# Altium PCB PitchShifter-PCB.PcbDoc (part 1 of 2)
Units mm, origin at the board's own origin, x right, y up, seen from the top; angles counter-clockwise.
Board outline 358.8 x 340 mm, 2 copper layers (Top Layer, Bottom Layer); 248 components, 206 nets, 919 pads, 27 vias.
Unrouted connection lines stored in the file: 494.
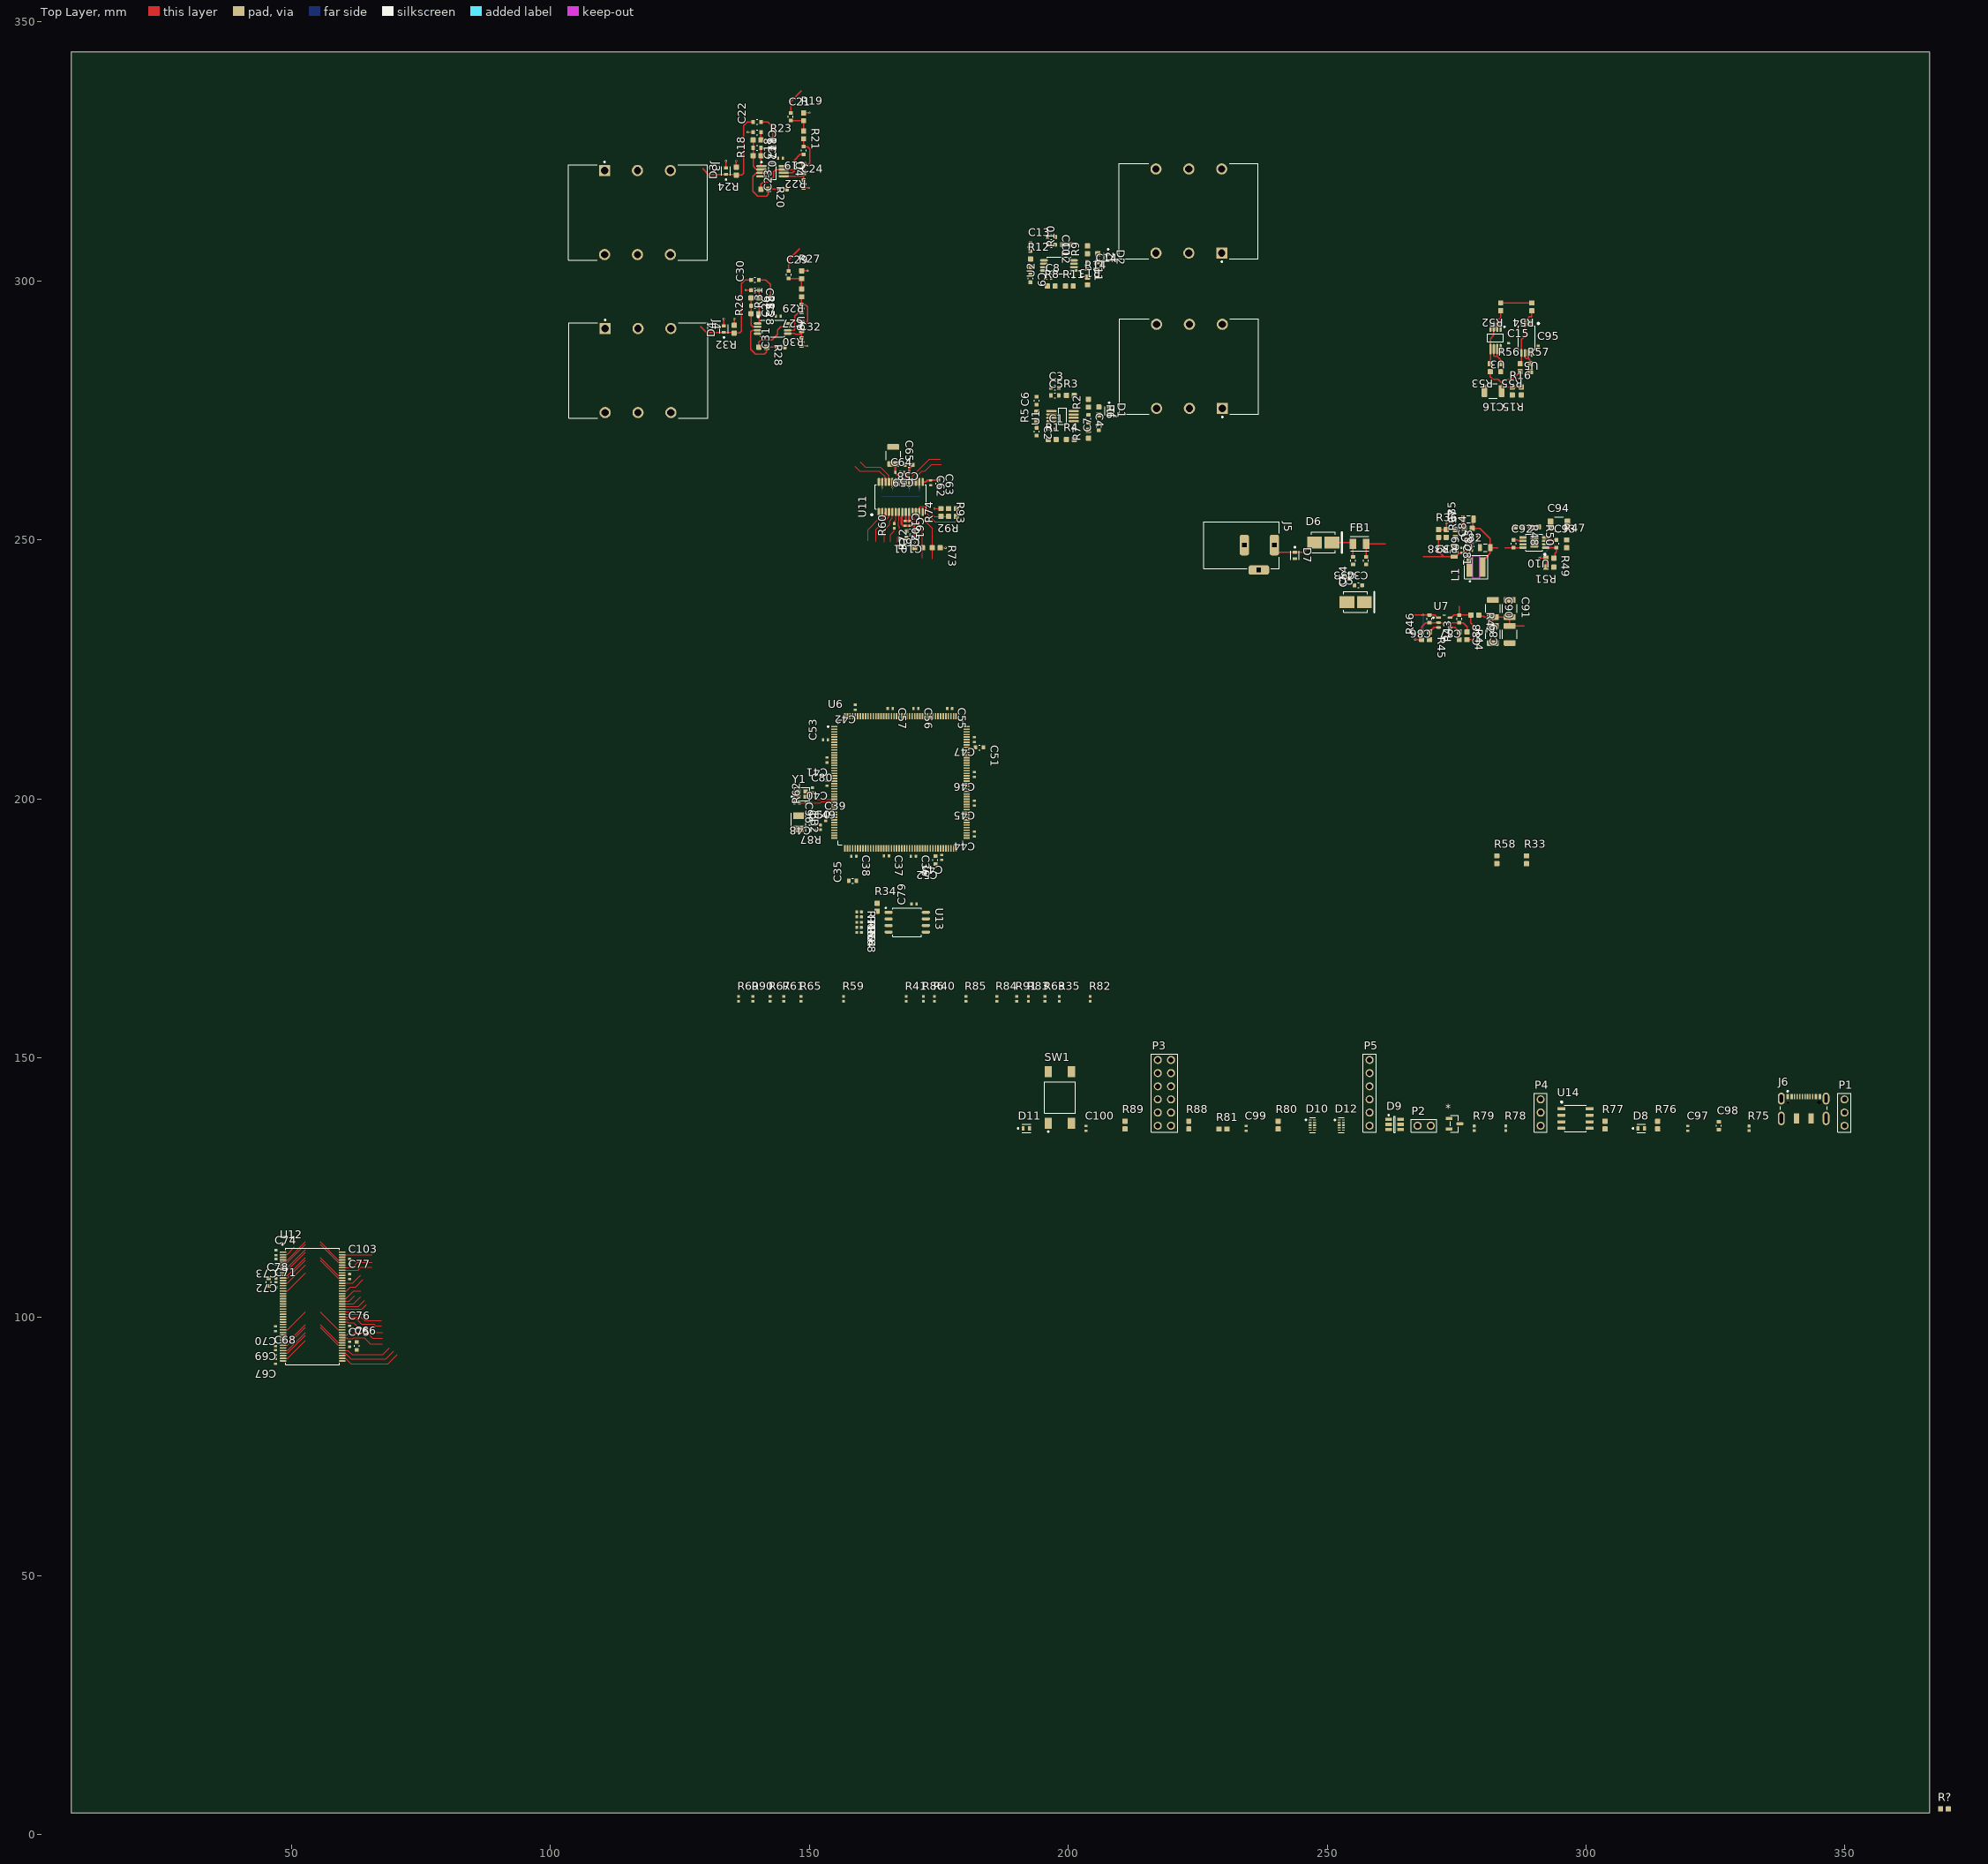
[diagram p0: Top Layer view]
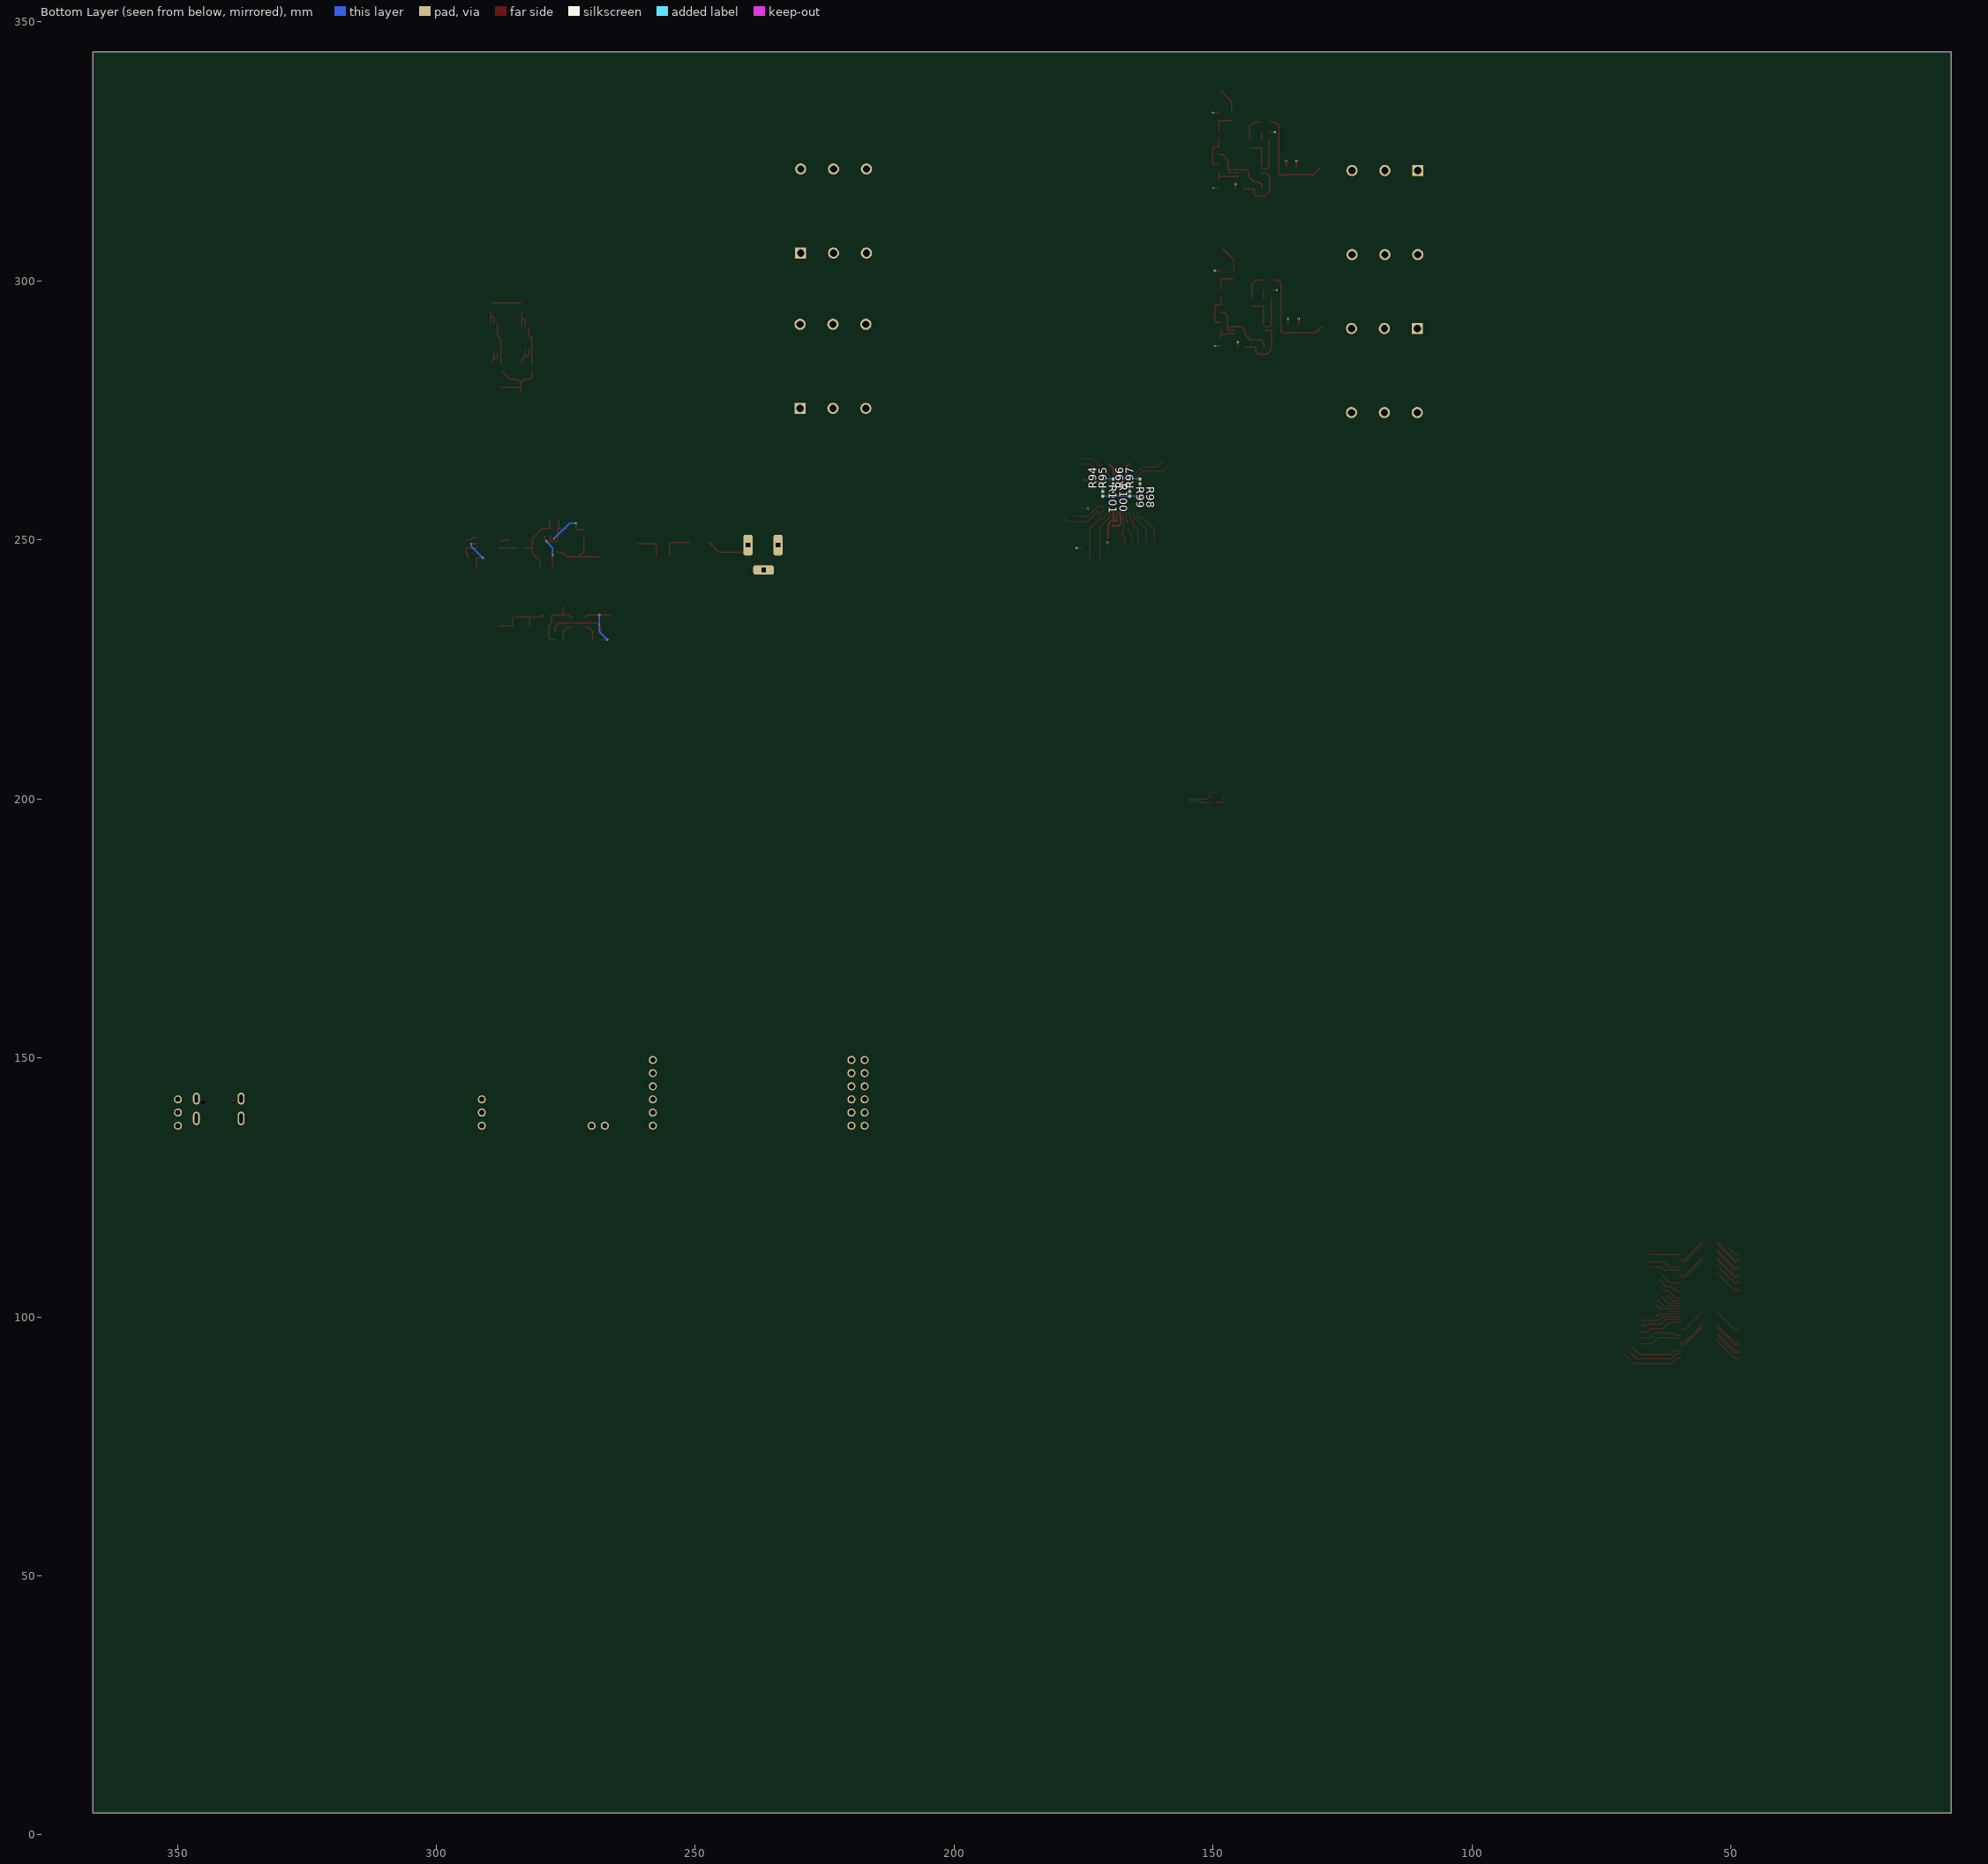
[diagram p1: Bottom Layer view, seen from below]

## Layer stack, top to bottom
Top Solder: solder mask 0.0102, Solder Resist, Dk 3.5
Top Layer: signal copper 0.0356
Dielectric 1: dielectric 0.32, FR-4, Dk 4.8
Bottom Layer: signal copper 0.0356
Bottom Solder: solder mask 0.0102, Solder Resist, Dk 3.5

## Board outline
7.5,4.2 7.5,344.2 366.3,344.2 366.3,4.2

## Design rules (kind name [scope] priority, off if disabled: settings)
Clearance [All] p1: gap=0.254 ignorepadtopadclearanceinfootprint=TRUE except(0.12: Arc-Arc Arc-Track Arc-SMDPad Track-Track Track-SMDPad SMDPad-SMDPad)
PolygonConnect [All] p1: connectstyle=Relief reliefconductorwidth=0.254 reliefentries=4 polygonreliefangle="90 Angle" airgapwidth=0.254
RoutingVias [All] p1: holewidth=0.711 width=1.27 viastyle="Through Hole" minholewidth=0.711 minwidth=1.27 maxholewidth=0.711 maxwidth=1.27
SolderMaskExpansion [All] p1: expansion=0 istentingtop=FALSE
SupplyNets "Schematic Supply Nets_13" [InNet('+VCC_FILT')] p1: voltage=0.000
SupplyNets "Schematic Supply Nets_10" [InNet('VCOM')] p2: voltage=0.000
SupplyNets "Schematic Supply Nets" [InNet('+3V3')] p3: voltage=0.000
SupplyNets "Schematic Supply Nets_4" [InNet('+V_USB')] p4: voltage=0.000
SupplyNets "Schematic Supply Nets_1" [InNet('+5V')] p5: voltage=0.000
SupplyNets "Schematic Supply Nets_12" [InNet('+4V')] p6: voltage=0.000
SupplyNets "Schematic Supply Nets_11" [InNet('+3V3A')] p7: voltage=0.000
SupplyNets "Schematic Supply Nets_9" [InNet('+VBUS')] p8: voltage=0.000
SupplyNets "Schematic Supply Nets_8" [InNet('+VBR')] p9: voltage=0.000
SupplyNets "Schematic Supply Nets_7" [InNet('+VCC_RP')] p10: voltage=0.000
SupplyNets "Schematic Supply Nets_6" [InNet('+VBL')] p11: voltage=0.000
SupplyNets "Schematic Supply Nets_5" [InNet('GND')] p12: voltage=0.000
SupplyNets "Schematic Supply Nets_3" [InNet('+VCC')] p13: voltage=0.000
SupplyNets "Schematic Supply Nets_2" [InNet('+5VA')] p14: voltage=0.000
Width [All] p1: maxlimit=1 minlimit=0.11 preferedwidth=0.2
30 further rules are at their usual default settings.

## Classes and differential pairs
net class SDRAM_MASK: RAM_DM0 RAM_DM1 RAM_DM2 RAM_DM3
net class SDRAM_DATA: RAM_D0 RAM_D1 RAM_D2 RAM_D3 RAM_D4 RAM_D5 RAM_D6 RAM_D7 RAM_D8 RAM_D9 RAM_D10 RAM_D11 RAM_D12 RAM_D13 RAM_D14 RAM_D15 RAM_D16 RAM_D17 RAM_D18 RAM_D19 RAM_D20 RAM_D21 RAM_D22 RAM_D23 RAM_D24 RAM_D25 RAM_D26 RAM_D27 RAM_D28 RAM_D29 RAM_D30 RAM_D31
net class SDRAM_CTRL: RAM_BA0 RAM_BA1 RAM_CKE RAM_CLK RAM_NCAS RAM_NCS RAM_NRAS RAM_NWE
net class SDRAM_ADR: RAM_A0 RAM_A1 RAM_A2 RAM_A3 RAM_A4 RAM_A5 RAM_A6 RAM_A7 RAM_A8 RAM_A9 RAM_A10 RAM_A11
net class QSPI: QSPI_CLK QSPI_CS QSPI_IO0 QSPI_IO1 QSPI_IO2 QSPI_IO3
component class Peripherals: * C97 C98 C99 C100 D8 D9 D10 D11 D12 J6 P1 P2 P3 P4 P5 R75 R76 R77 R78 R79 R80 R81 R88 R89 SW1 U14
component class Power: C33 C34 C54 C81 C82 C83 C84 C85 C86 C87 C88 C89 C90 C91 C92 C93 C94 D5 D6 D7 FB1 J5 L1 R36 R37 R38 R39 R42 R43 R44 R45 R46 R47 R48 R49 R50 R51 R? U7 U9 U10
component class Memory: C66 C67 C68 C69 C70 C71 C72 C73 C74 C75 C76 C77 C78 C79 C103 R34 U12 U13
component class MCU: C35 C36 C37 C38 C39 C40 C41 C42 C43 C44 C45 C46 C47 C48 C49 C50 C51 C52 C53 C55 C56 C57 C80 C96 FB2 R35 R40 R41 R59 R61 R62 R63 R64 R65 R66 R67 R68 R69 R70 R71 R82 R83 R84 R85 R86 R87 R90 R91 U6 Y1
component class Codec: C58 C59 C60 C61 C62 C63 C64 C65 C101 C102 R60 R72 R73 R74 R92 R93 R94 R95 R96 R97 R98 R99 R100 R101 U11
component class Analogue_OUT: C17 C18 C19 C20 C21 C22 C23 C24 C25 C26 C27 C28 C29 C30 C31 C32 D3 D4 J3 J4 R17 R18 R19 R20 R21 R22 R23 R24 R25 R26 R27 R28 R29 R30 R31 R32 U4 U8
component class Analogue_IN: C1 C2 C3 C4 C5 C6 C7 C8 C9 C10 C11 C12 C13 C14 C15 C16 C95 D1 D2 J1 J2 R1 R2 R3 R4 R5 R6 R7 R8 R9 R10 R11 R12 R13 R14 R15 R16 R33 R52 R53 R54 R55 R56 R57 R58 U1 U2 U3 U5

## Components (designator, comment, footprint, x,y, rotation, side; value= is the part's Value field where it differs from the comment)
* "ESD2CAN24DBZRQ1" SOT-23_ESD2CAN24DBZRQ1 274.574,137.287 r0 top
C1 "100n" CAPC1005X50N_0402 196.9,271.4 r0 top
C2 "1n5" C_0402 193.9,270.9 r270 top
C3 "2u2" C_0402 197.4,279.4 r0 top
C4 "10n" C_0402 203.9,273.4 r270 top
C5 "220p" C_0402 197.4,277.9 r0 top
C6 "1n5" C_0402 193.9,276.9 r90 top
C7 "220p" C_0402 205.9,271.9 r90 top
C8 "100n" CAPC1005X50N_0402 196.2,300.5 r0 top
C9 "1n5" C_0402 192.7,300.5 r270 top
C10 "2u2" C_0402 196.7,308.5 r0 top
C11 "10n" C_0402 203.7,303 r270 top
C12 "220p" C_0402 196.7,307 r0 top
C13 "1n5" C_0402 192.7,306.5 r90 top
C14 "220p" C_0402 205.7,301.5 r90 top
C15 "100n" CAPC1005X50N_0402 285,287.5 r90 top
C16 "100u" C_1210 282,278.75 r180 top
C17 "2u2" C_0402 139.9,328.7 r0 top
C18 "100n" CAPC1005X50N_0402 144.4,323.7 r180 top
C19 "1n5" C_0402 148.9,325.2 r270 top
C20 "220p" C_0402 139.9,325.7 r0 top
C21 "2u2" C_0402 146.4,331.7 r90 top
C22 "2u2" C_0402 139.9,330.7 r180 top
C23 "220p" C_0402 144.9,317.7 r180 top
C24 "1n5" C_0402 148.9,318.7 r90 top
C25 "2u2" C_0402 139.5,298.2 r0 top
C26 "100n" CAPC1005X50N_0402 144,293.2 r180 top
C27 "1n5" C_0402 148.5,294.7 r270 top
C28 "220p" C_0402 139.5,295.2 r0 top
C29 "2u2" C_0402 146,301.2 r90 top
C30 "2u2" C_0402 139.5,300.2 r180 top
C31 "220p" C_0402 144.5,287.2 r180 top
C32 "1n5" C_0402 148.5,288.2 r90 top
C33 "2u2" C_0402 255,246 r270 top
C34 "2u2" C_0402 257.5,246 r270 top
C35 "2u2" C_0402 158.35,184.2 r180 top
C36 "100n" CAPC1005X50N_0402 170.1,188.95 r0 top
C37 "100n" CAPC1005X50N_0402 164.9,189 r0 top
C38 "100n" CAPC1005X50N_0402 158.6,188.95 r0 top
C39 "100n" CAPC1005X50N_0402 153.15,196.25 r90 top
C40 "100n" CAPC1005X50N_0402 153.4,203 r270 top
C41 "100n" CAPC1005X50N_0402 153.4,207.5 r270 top
C42 "100n" CAPC1005X50N_0402 158.85,217.7 r270 top
C43 "100n" CAPC1005X50N_0402 175.6,188.7 r270 top
C44 "100n" CAPC1005X50N_0402 181.85,193.2 r270 top
C45 "100n" CAPC1005X50N_0402 181.85,199.2 r270 top
C46 "100n" CAPC1005X50N_0402 181.85,204.7 r270 top
C47 "100n" CAPC1005X50N_0402 181.85,211.45 r270 top
C48 "100n" CAPC1005X50N_0402 150.15,196.25 r270 top
C49 "100n" CAPC1005X50N_0402 151.15,194.5 r90 top
C50 "100n" CAPC1005X50N_0402 150.15,194.5 r90 top
C51 "2u2" C_0402 182.85,209.95 r0 top
C52 "2u2" C_0402 174.35,188.2 r270 top
C53 "100n" CAPC1005X50N_0402 153.1,211.45 r180 top
C54 "2u2" C_0402 256,241.25 r180 top
C55 "100n" CAPC1005X50N_0402 177.1,217.45 r0 top
C56 "100n" CAPC1005X50N_0402 170.6,217.45 r0 top
C57 "100n" CAPC1005X50N_0402 165.6,217.45 r0 top
C58 "1u" C_0402 169.2,264.5 r180 top
C59 "100n" CAPC1005X50N_0402 168.8,263 r180 top
C60 "1u" C_0402 169.5,251.7 r180 top
C61 "100n" CAPC1005X50N_0402 169.4,253.2 r270 top
C62 "100n" CAPC1005X50N_0402 173.4,261.05 r270 top
C63 "1u" C_0402 174.9,260.9 r270 top
C64 "100n" CAPC1005X50N_0402 167.1,263 r0 top
C65 "47u" C_1210 166.2,266.3 r270 top
C66 "2u2" C_0402 62.6,94.4 r90 top
C67 "100n" CAPC1005X50N_0402 46.9,91.4 r270 top
C68 "100n" CAPC1005X50N_0402 46.9,93.1 r90 top
C69 "100n" CAPC1005X50N_0402 46.9,94.8 r270 top
C70 "100n" CAPC1005X50N_0402 46.9,97.7 r270 top
C71 "100n" CAPC1005X50N_0402 47,106.2 r90 top
C72 "100n" CAPC1005X50N_0402 47,107.9 r270 top
C73 "100n" CAPC1005X50N_0402 47,110.7 r270 top
C74 "100n" CAPC1005X50N_0402 47,112.4 r90 top
C75 "100n" CAPC1005X50N_0402 61.2,94.7 r90 top
C76 "100n" CAPC1005X50N_0402 61.2,97.8 r90 top
C77 "100n" CAPC1005X50N_0402 61.2,107.8 r90 top
C78 "2u2" C_0402 45.6,106.7 r90 top
C79 "100n" CAPC1005X50N_0402 170.2,179.7 r180 top
C80 "5p6" CAPC1005X50N_0402 150.6,201.7 r90 top
C81 "10u" C_0805 274.5,247.75 r270 top
C82 "100n" CAPC1005X50N_0402 276,248 r90 top
C83 "22u" C_0805 280.5,248.5 r180 top
C84 "100n" CAPC1005X50N_0402 278.5,250.75 r180 top
C85 "47p" C_0805 277.25,254 r180 top
C86 "2u2" C_0402 269.75,234.75 r270 top
C87 "2u2" C_0402 275.5,234.75 r270 top
C88 "47u" C_1210 282,231.75 r90 top
C89 "47u" C_1210 285.25,231.75 r90 top
C90 "47u" C_1210 282,236.75 r270 top
C91 "47u" C_1210 285.25,236.75 r270 top
C92 "2u2" C_0402 286,249.25 r90 top
C93 "2u2" C_0402 294.25,249.25 r90 top
C94 "47u" C_1210 294.75,253 r0 top
C95 "100n" CAPC1005X50N_0402 290.75,287 r90 top
C96 "5p6" CAPC1005X50N_0402 147.6,199.2 r0 top
C97 "100n" CAPC1005X50N_0402 319.659,136.398 r90 top
C98 "2u2" C_0402 325.628,136.906 r90 top
C99 "100n" CAPC1005X50N_0402 234.315,136.398 r90 top
C100 "100n" CAPC1005X50N_0402 203.454,136.398 r90 top
C101 "1u" C_0402 169.5,250.4 r180 top
C102 "100n" CAPC1005X50N_0402 168.5,253.2 r270 top
C103 "100n" CAPC1005X50N_0402 61.2,110.7 r90 top
D1 "0603ESDA-05N" FP-1610-MFG 207.9,274.9 r270 top
D2 "0603ESDA-05N" FP-1610-MFG 207.7,304.5 r270 top
D3 "0603ESDA-05N" FP-1610-MFG 133.9,321.2 r90 top
D4 "0603ESDA-05N" FP-1610-MFG 133.5,290.7 r90 top
D5 "BAT165AX" JCET-SMB-2_M 255.5,238 r0 top
D6 "BAT165AX" JCET-SMB-2_M 249.25,249.5 r0 top
D7 "CG0402MLU-12G" FP-1610-MFG 243.75,247 r270 top
D8 "CG0402MLU-12G" FP-1610-MFG 310.642,136.398 r0 top
D9 "USBLC6-2SC6" STM-SOT23-6L_V 263.017,137.16 r0 top
D10 "TPD4E02B04DQAR" FP-DQA0010A-MFG 247.142,137.033 r0 top
D11 "CG0402MLU-3.3LG" FP-1610-MFG 191.897,136.398 r0 top
D12 "TPD4E02B04DQAR" FP-DQA0010A-MFG 252.73,137.033 r0 top
FB1 "120R" FP-NFZ32BW-w2_8-MFG 256.25,249.25 r0 top
FB2 "120R" FP-NFZ32BW-w2_8-MFG 147.9,195.5 r270 top
J1 "NMJ6HCD2" FP-NMJ6HCD2-MFG 223.315,283.515 r180 top
J2 "NMJ6HCD2" FP-NMJ6HCD2-MFG 223.2,313.5 r180 top
J3 "NMJ6HCD2" FP-NMJ6HCD2-MFG 116.9,313.2 r0 top
J4 "NMJ6HCD2" FP-NMJ6HCD2-MFG 117,282.7 r0 top
J5 "694108301002" 694108301002 233.45,249 r270 top
J6 "DX07S016JA1R1500" FP-DX07S016JA1R1500-MFG 342.011,139.319 r0 top
L1 "3u3" WE-XHMI_4030 278.75,244.75 r90 top
P1 "Male Pin Header 1x3 2.54mm" "Copy of Copy of Copy of Copy of Copy of 3M-2340-6111TG_V" 351.79,134.874 r90 top
P2 "JP" "Copy of Copy of Copy of Copy of 3M-2340-6111TG_V"#1 265.43,135.001 r0 top
P3 "Male Pin Header 2x6 2.54mm" "Copy of Copy of Copy of 3M-2340-6111TG_V" 221.742,134.874 r90 top
P4 "Male Pin Header 1x3 2.54mm" "Copy of Copy of Copy of Copy of Copy of 3M-2340-6111TG_V" 293.116,134.874 r90 top
P5 "Male Pin Header 1x6 2.54mm" "Copy of Copy of Copy of Copy of 3M-2340-6111TG_V"#2 260.096,134.874 r90 top
R1 "5k1" R_0603 196.9,269.4 r0 top
R2 "1M" R_0603 203.9,276.4 r90 top
R3 "5k1" R_0603 200.4,277.9 r0 top
R4 "5k1" R_0603 200.4,269.4 r0 top
R5 "5k1" R_0603 193.9,273.9 r90 top
R6 "68R" R_0603 205.9,274.9 r270 top
R7 "1M" R_0603 203.9,270.4 r90 top
R8 "5k1" R_0603 196.7,299 r0 top
R9 "1M" R_0603 203.7,306 r90 top
R10 "5k1" R_0603 199.7,307 r180 top
R11 "5k1" R_0603 200.2,299 r0 top
R12 "5k1" R_0603 192.7,303.5 r90 top
R13 "68R" R_0603 205.7,304.5 r270 top
R14 "1M" R_0603 203.7,300 r90 top
R15 "5k1" R_0603 287.5,278.75 r270 top
R16 "5k1" R_0603 285.75,278.75 r90 top
R17 "5k1" R_0603 139.9,327.2 r0 top
R18 "5k1" R_0603 139.9,324.2 r180 top
R19 "1M" R_0603 148.9,331.7 r90 top
R20 "5k1" R_0603 141.4,317.7 r0 top
R21 "5k1" R_0603 148.9,328.2 r270 top
R22 "5k1" R_0603 148.9,321.7 r270 top
R23 "68R" R_0603 142.9,326.45 r90 top
R24 "5k1" R_0603 135.9,321.2 r270 top
R25 "5k1" R_0603 139.5,296.7 r0 top
R26 "5k1" R_0603 139.5,293.7 r180 top
R27 "1M" R_0603 148.5,301.2 r90 top
R28 "5k1" R_0603 141,287.2 r0 top
R29 "5k1" R_0603 148.5,297.7 r270 top
R30 "5k1" R_0603 148.5,291.2 r270 top
R31 "68R" R_0603 142.5,295.95 r90 top
R32 "5k1" R_0603 135.5,290.7 r270 top
R33 "0R" R_0603 288.5,188.25 r90 top
R34 "47k" R_0603 163.1,179.1 r90 top
R35 "33R" R_0402 198.276,161.4 r90 top
R36 "30k" R_0603 271.5,251.25 r90 top
R37 "30k" R_0603 277.25,252.25 r180 top
R38 "30k" R_0603 273,251.25 r270 top
R39 "5k1" R_0603 274.75,251.25 r270 top
R40 "33R" R_0402 174.146,161.4 r90 top
R41 "33R" R_0402 168.685,161.4 r90 top
R42 "10R" R_0603 278.5,235.5 r0 top
R43 "47k" R_0603 276.25,230.75 r180 top
R44 "15k" R_0603 276.25,232.25 r0 top
R45 "30k" R_0603 269,230.75 r0 top
R46 "30k" R_0603 269,232.25 r180 top
R47 "10R" R_0603 296.25,249.25 r90 top
R48 "30k" R_0603 287,252.5 r0 top
R49 "0R" R_0603 293,246.5 r0 top
R50 "30k" R_0603 290,252.5 r0 top
R51 "DNP" R_0603 293,244.75 r180 top
R52 "0R" R_0603 283.5,295 r270 top
R53 "0R" R_0603 281.5,283.25 r270 top
R54 "0R" R_0603 289.5,295 r270 top
R55 "0R" R_0603 287.25,283.25 r270 top
R56 "0R" R_0603 283.5,283.25 r90 top
R57 "0R" R_0603 289.25,283.25 r90 top
R58 "0R" R_0603 282.75,188.25 r90 top
R59 "33R" R_0402 156.62,161.4 r90 top
R60 "33R" R_0402 166.4,252.7 r90 top
R61 "33R" R_0402 145.063,161.4 r90 top
R62 "49R9" R_0402 149.85,199.2 r180 top
R63 "33R" R_0402 195.498,161.4 r90 top
R64 "33R" R_0402 159.6,175.2 r0 top
R65 "33R" R_0402 148.381,161.4 r90 top
R66 "33R" R_0402 159.6,177.228 r0 top
R67 "33R" R_0402 142.412,161.4 r90 top
R68 "33R" R_0402 159.6,174.2 r0 top
R69 "33R" R_0402 136.316,161.4 r90 top
R70 "33R" R_0402 159.6,176.2 r0 top
R71 "33R" R_0402 159.6,178.2 r0 top
R72 "2k2" R_0603 171.1,248.5 r180 top
R73 "2k2" R_0603 174.5,248.5 r0 top
R74 "DNP" R_0603 175.4,255.3 r90 top
R75 "33R" R_0402 331.47,136.398 r90 top
R76 "5k1" R_0603 313.817,137.033 r90 top
R77 "5k1" R_0603 303.657,137.033 r90 top
R78 "33R" R_0402 284.48,136.398 r90 top
R79 "120R" R_0402 278.384,136.398 r90 top
R80 "30k" R_0603 240.538,137.033 r90 top
R81 "30k" R_0603 229.87,136.271 r0 top
R82 "33R" R_0402 204.245,161.4 r90 top
R83 "33R" R_0402 192.307,161.4 r90 top
R84 "33R" R_0402 186.211,161.4 r90 top
R85 "33R" R_0402 180.242,161.4 r90 top
R86 "33R" R_0402 172.003,161.4 r90 top
R87 "0R" R_0402 152.15,194.5 r270 top
R88 "30k" R_0603 223.266,137.033 r90 top
R89 "10k" R_0603 210.947,137.033 r90 top
R90 "33R" R_0402 139.094,161.4 r90 top
R91 "33R" R_0402 190.037,161.4 r90 top
R92 "10k" R_0603 178.4,255.3 r270 top
R93 "10k" R_0603 176.9,255.3 r270 top
R94 "DNP" R_0402 171.3,261.3 r90 bottom
R95 "DNP" R_0402 169.3,261.3 r90 bottom
R96 "DNP" R_0402 166.1,261.3 r90 bottom
R97 "DNP" R_0402 164.1,261.3 r90 bottom
R98 "DNP" R_0402 164.1,258.9 r270 bottom
R99 "DNP" R_0402 166.1,258.9 r270 bottom
R100 "DNP" R_0402 169.3,258.9 r270 bottom
R101 "DNP" R_0402 171.3,258.9 r270 bottom
R? "0R" R_0603 369.199,5 r0 top
SW1 "1301.9316.24" FP-1301_9316_24-MFG 198.374,142.367 r90 top
U1 "MCP6002-E/MS" MSOP-MS8_M 198.9,273.9 r180 top
U2 "TLV9062IPWR" TSSOP-8_TLV9062IPWR 198.2,303 r180 top
U3 "MCP6002-E/MS" MSOP-MS8_M 282.5,289 r270 top
U4 "MCP6002-E/MS" MSOP-MS8_M 142.9,321.2 r0 top
U5 "TLV9062IPWR" TSSOP-8_TLV9062IPWR 288.5,289 r270 top
U6 "STM32H743IIT6" FP-LQFP176-1T-MFG 167.6,203.2 r0 top
U7 "NCP718BSNADJT1G" FP-419AE-01-IPC_C 272.615,234.05 r0 top
U8 "TLV9062IPWR" TSSOP-8_TLV9062IPWR 142.912,290.813 r0 top
U9 "TPS562243DRLR" SOT-563-6_TPS56224 277.5,248.75 r90 top
U10 "TLV76718DGNR" HVSSOP-8-PowerPAD_TLV767 290,249.5 r180 top
U11 "CS4272-DZZ" TSSOP-28_CS4272 167.65,258.3 r90 top
U12 "IS42S32400J-6TL" TSOP-II-86_IS42S32400J-6TL 54.102,102.005 r0 top
U13 "W25Q128JWSIM" SOIC-8_W25Q128JWSIM 168.9,176.2 r0 top
U14 "TCAN3404DRQ1" SOIC-8_TCAN3404DRQ1 297.942,138.303 r0 top
Y1 "25MHz" FP-NX2016SA-MFG 148.6,200.95 r0 top

## Footprints (in the part's own frame and the unit in brackets; to place one, negate y for a bottom-side part, rotate by r counter-clockwise, add the part's x,y. Pads: shape width x height; smd on the part's side, far side on the other; paste and mask are expansions set on the pad)
694108301002 [mm] "DC Power Jack Right Angled(6.4)"
  rrect50% 4x1.8 hole 0.8 square: 1(0,6.35) 2(0,0.55)
  rrect50% 1.8x4 hole 0.8 square: 3(4.8,3.35)
  silkscreen extent -4.5,-7.25 4.5,7.25, body extent -4.5,-7.25 5,7.25, height 10.75
C_0402 [mm] "MLCC 0402"
  rrect25% 0.7x0.8 smd: 1(-0.75,0) 2(0.75,0)
  silkscreen extent -0.14,-0.47 0.14,0.47, body extent -0.8,-0.4 0.8,0.4, height 0.8
C_0805 [mm] "MLCC 0805 Cap"
  rrect25% 0.8x1.4 smd: 1(-1,0) 2(1,0)
  silkscreen extent -0.34,-0.7 0.34,0.7, body extent -1.05,-0.63 1.04,0.63, height 1.25
C_1210 [mm] "MLCC 1210 Cap"
  rrect25% 1.1x2.3 smd: 1(-1.65,0) 2(1.65,0)
  silkscreen extent -0.84,-1.41 0.84,1.41, body extent -1.6,-1.25 1.6,1.25, height 2.5
CAPC1005X50N_0402 [mm] "Chip Capacitor, 2-Leads, Body 0402, 1.00x0.50mm, IPC Medium Density"
  rrect25% 0.45x0.6 smd: 1(-0.475,0) 2(0.475,0)
  body extent -0.5,-0.25 0.5,0.25, height 0.5
"Copy of Copy of Copy of 3M-2340-6111TG_V" [mm] "THD, 40-Leads, Body 101.6x2.54mm, Pitch 2.54mm"
  round 1.55 hole 1.02: 1(2.032,1.905) 2(4.572,1.905) 3(7.112,1.905) 4(9.652,1.905) 5(12.192,1.905) 6(14.732,1.905) 7(2.032,4.445) 7(2.032,4.445) 8(4.572,4.445) 9(7.112,4.445) 10(9.652,4.445) 11(12.192,4.445) 12(14.732,4.445)
  silkscreen extent 0.76,0.64 15.88,5.72, body extent 0.76,0.64 15.88,5.72, height 8.64
"Copy of Copy of Copy of Copy of 3M-2340-6111TG_V"#1 [mm] "THD, 40-Leads, Body 101.6x2.54mm, Pitch 2.54mm"
  round 1.55 hole 1.02: 1(2.032,1.905) 2(4.572,1.905)
  silkscreen extent 0.76,0.64 5.71,3.17, body extent 0.76,0.64 5.71,3.17, height 8.64
"Copy of Copy of Copy of Copy of 3M-2340-6111TG_V"#2 [mm] "THD, 40-Leads, Body 101.6x2.54mm, Pitch 2.54mm"
  round 1.55 hole 1.02: 1(2.032,1.905) 2(4.572,1.905) 3(7.112,1.905) 4(9.652,1.905) 5(12.192,1.905) 6(14.732,1.905)
  silkscreen extent 0.76,0.64 15.88,3.18, body extent 0.76,0.64 15.88,3.18, height 8.64
"Copy of Copy of Copy of Copy of Copy of 3M-2340-6111TG_V" [mm] "THD, 40-Leads, Body 101.6x2.54mm, Pitch 2.54mm"
  round 1.55 hole 1.02: 1(2.032,1.905) 2(4.572,1.905) 3(7.112,1.905)
  silkscreen extent 0.76,0.64 8.25,3.18, body extent 0.76,0.64 8.25,3.18, height 8.64
FP-419AE-01-IPC_C [mm]
  rect 0.94x0.486 smd paste+0 mask+0: 1(-1.115,0.95)
  rrect100% 0.94x0.486 smd paste+0 mask+0: 2(-1.115,0) 3(-1.115,-0.95) 4(1.116,-0.95) 5(1.116,0.95)
  silkscreen extent -2.21,-1.45 0.8,1.45, body extent -1.69,-1.55 1.69,1.55, height 0.25
FP-1301_9316_24-MFG [mm]
  rect 2.1x1.4 smd paste+0 mask+0: 1(-5,2.25) 2(5,2.25) 3(-5,-2.25) 4(5,-2.25)
  silkscreen extent -6.72,-3 3,3, body extent -6.15,-3.1 6.15,3.1, height 0.25
FP-1610-MFG [mm]
  rect 0.55x0.8 smd paste-1000 mask+0: 1(-0.625,0) 2(0.625,0)
  silkscreen extent -1.72,-0.82 0.85,0.82, body extent -1,-0.65 1,0.65, height 0.25
FP-DQA0010A-MFG [mm]
  rrect50% 0.565x0.2 smd paste+0 mask+0: 1(-0.417,1) 2(-0.417,0.5) 4(-0.417,-0.5) 5(-0.417,-1) 6(0.417,-1) 7(0.417,-0.5) 9(0.417,0.5) 10(0.417,1)
  rrect25% 0.565x0.4 smd paste-1000 mask+0: 3(-0.417,0) 8(0.417,0)
  silkscreen extent -1.37,-1.48 0.55,1.48, body extent -0.8,-1.4 0.8,1.4, height 0.25
FP-DX07S016JA1R1500-MFG [mm]
  rrect100% 1.3x2.3 hole 1.6 slot 0.6 at 0 deg paste-2539.97 mask+0: 1(-4.32,2.825) 2(4.32,2.825)
  rrect100% 1.3x2.6 hole 1.9 slot 0.6 at 0 deg paste-2539.97 mask+0: 3(-4.32,-1) 6(4.32,-1)
  rect 1x2 smd paste+0 mask+0: 4(-1.4,-1) 5(1.4,-1)
  rect 0.52x1 smd paste+0 mask+0: A1/B12(-3.1,3.2) A4/B9(-2.35,3.2) A12/B1(3.1,3.2) B4/A9(2.35,3.2)
  rect 0.27x1 smd paste+0 mask+0: A5(-1.75,3.2) A6(-0.25,3.2) A7(0.75,3.2) A8(1.75,3.2) B5(1.25,3.2) B6(0.25,3.2) B7(-0.75,3.2) B8(-1.25,3.2)
  round 0.6 hole 0.6 unplated paste-2539.97 mask+0: ""(-3,2.1)
  rrect100% 0.85x0.6 hole 0.6 slot 0.85 at 0 deg unplated paste-2539.97 mask+0: ""(3,2.1)
  silkscreen extent -4.52,0.67 4.52,4.37, body extent -5.07,-3.75 5.07,4.08, height 0.25
FP-LQFP176-1T-MFG [mm]
  rect 1.2x0.3 smd paste+0 mask+0: 1(-12.75,10.75) 2(-12.75,10.25) 3(-12.75,9.75) 4(-12.75,9.25) 5(-12.75,8.75) 6(-12.75,8.25) 7(-12.75,7.75) 8(-12.75,7.25) 9(-12.75,6.75) 10(-12.75,6.25) 11(-12.75,5.75) 12(-12.75,5.25) 13(-12.75,4.75) 14(-12.75,4.25) 15(-12.75,3.75) 16(-12.75,3.25) 17(-12.75,2.75) 18(-12.75,2.25) 19(-12.75,1.75) 20(-12.75,1.25) 21(-12.75,0.75) 22(-12.75,0.25) 23(-12.75,-0.25) 24(-12.75,-0.75) 25(-12.75,-1.25) 26(-12.75,-1.75) 27(-12.75,-2.25) 28(-12.75,-2.75) 29(-12.75,-3.25) 30(-12.75,-3.75) 31(-12.75,-4.25) 32(-12.75,-4.75) 33(-12.75,-5.25) 34(-12.75,-5.75) 35(-12.75,-6.25) 36(-12.75,-6.75) 37(-12.75,-7.25) 38(-12.75,-7.75) 39(-12.75,-8.25) 40(-12.75,-8.75) 41(-12.75,-9.25) 42(-12.75,-9.75) 43(-12.75,-10.25) 44(-12.75,-10.75) 89(12.75,-10.75) 90(12.75,-10.25) 91(12.75,-9.75) 92(12.75,-9.25) 93(12.75,-8.75) 94(12.75,-8.25) 95(12.75,-7.75) 96(12.75,-7.25) 97(12.75,-6.75) 98(12.75,-6.25) 99(12.75,-5.75) 100(12.75,-5.25) 101(12.75,-4.75) 102(12.75,-4.25) 103(12.75,-3.75) 104(12.75,-3.25) 105(12.75,-2.75) 106(12.75,-2.25) 107(12.75,-1.75) 108(12.75,-1.25) 109(12.75,-0.75) 110(12.75,-0.25) 111(12.75,0.25) 112(12.75,0.75) 113(12.75,1.25) 114(12.75,1.75) 115(12.75,2.25) 116(12.75,2.75) 117(12.75,3.25) 118(12.75,3.75) 119(12.75,4.25) 120(12.75,4.75) 121(12.75,5.25) 122(12.75,5.75) 123(12.75,6.25) 124(12.75,6.75) 125(12.75,7.25) 126(12.75,7.75) 127(12.75,8.25) 128(12.75,8.75) 129(12.75,9.25) 130(12.75,9.75) 131(12.75,10.25) 132(12.75,10.75)
  rect 0.3x1.2 smd paste+0 mask+0: 45(-10.75,-12.75) 46(-10.25,-12.75) 47(-9.75,-12.75) 48(-9.25,-12.75) 49(-8.75,-12.75) 50(-8.25,-12.75) 51(-7.75,-12.75) 52(-7.25,-12.75) 53(-6.75,-12.75) 54(-6.25,-12.75) 55(-5.75,-12.75) 56(-5.25,-12.75) 57(-4.75,-12.75) 58(-4.25,-12.75) 59(-3.75,-12.75) 60(-3.25,-12.75) 61(-2.75,-12.75) 62(-2.25,-12.75) 63(-1.75,-12.75) 64(-1.25,-12.75) 65(-0.75,-12.75) 66(-0.25,-12.75) 67(0.25,-12.75) 68(0.75,-12.75) 69(1.25,-12.75) 70(1.75,-12.75) 71(2.25,-12.75) 72(2.75,-12.75) 73(3.25,-12.75) 74(3.75,-12.75) 75(4.25,-12.75) 76(4.75,-12.75) 77(5.25,-12.75) 78(5.75,-12.75) 79(6.25,-12.75) 80(6.75,-12.75) 81(7.25,-12.75) 82(7.75,-12.75) 83(8.25,-12.75) 84(8.75,-12.75) 85(9.25,-12.75) 86(9.75,-12.75) 87(10.25,-12.75) 88(10.75,-12.75) 133(10.75,12.75) 134(10.25,12.75) 135(9.75,12.75) 136(9.25,12.75) 137(8.75,12.75) 138(8.25,12.75) 139(7.75,12.75) 140(7.25,12.75) 141(6.75,12.75) 142(6.25,12.75) 143(5.75,12.75) 144(5.25,12.75) 145(4.75,12.75) 146(4.25,12.75) 147(3.75,12.75) 148(3.25,12.75) 149(2.75,12.75) 150(2.25,12.75) 151(1.75,12.75) 152(1.25,12.75) 153(0.75,12.75) 154(0.25,12.75) 155(-0.25,12.75) 156(-0.75,12.75) 157(-1.25,12.75) 158(-1.75,12.75) 159(-2.25,12.75) 160(-2.75,12.75) 161(-3.25,12.75) 162(-3.75,12.75) 163(-4.25,12.75) 164(-4.75,12.75) 165(-5.25,12.75) 166(-5.75,12.75) 167(-6.25,12.75) 168(-6.75,12.75) 169(-7.25,12.75) 170(-7.75,12.75) 171(-8.25,12.75) 172(-8.75,12.75) 173(-9.25,12.75) 174(-9.75,12.75) 175(-10.25,12.75) 176(-10.75,12.75)
  silkscreen extent -14.12,-12.05 12.05,12.05, body extent -13.45,-13.45 13.45,13.45, height 0.25
FP-NFZ32BW-w2_8-MFG [mm]
  rect 1.25x2 smd paste+0 mask+0: 1(-1.275,0) 2(1.275,0)
  silkscreen extent -1.75,-1.4 1.75,1.4, body extent -2,-1.5 2,1.5, height 0.25
FP-NMJ6HCD2-MFG [mm]
  rect 2.15x2.15 hole 1.4 paste-2539.97 mask+0: 1(-6.435,8.115)
  round 2.15 hole 1.4 paste-2539.97 mask+0: 2(-0.085,8.115) 3(6.265,8.115) 4(-6.435,-8.115) 5(-0.085,-8.115) 6(6.265,-8.115)
  silkscreen extent -13.41,-9.2 13.41,9.91, body extent -13.51,-9.3 13.51,9.3, height 0.25
FP-NX2016SA-MFG [mm]
  rect 0.85x0.75 smd paste+0 mask+0: 1(-0.675,-0.525) 2(0.675,-0.525) 3(0.675,0.525) 4(-0.675,0.525)
  silkscreen extent -2.07,-1.28 1.48,1.28, body extent -1.2,-1 1.2,1, height 0.25
HVSSOP-8-PowerPAD_TLV767 [mm] "TLV767 LDO"
  rrect50% 1.4x0.45 smd: 1(-2.2,0.975) 2(-2.2,0.325) 3(-2.2,-0.325) 4(-2.2,-0.975) 5(2.2,-0.975) 6(2.2,-0.325) 7(2.2,0.325) 8(2.2,0.975)
  rrect10% 1.57x1.89 smd paste-0.314: 9(0,0)
  silkscreen extent -2.09,-1.61 1.61,2.35, body extent -2.45,-1.55 2.45,1.55, height 1.1
JCET-SMB-2_M [mm] "Molded Diode, 2-Leads, Body 4.57x3.94mm"
  rect 2.85x2.25 smd: 1(-1.675,0) 2(1.675,0)
  silkscreen extent -2.3,-2 3.6,2, body extent -2.5,-1.97 2.5,1.97, height 2.44
MSOP-MS8_M [mm] "TSOP, 8-Leads, Body 3x3mm, Pitch 0.65mm, IPC Low Density"
  oval 2x0.45 smd: 1(-2.15,0.975) 2(-2.15,0.325) 3(-2.15,-0.325) 4(-2.15,-0.975) 5(2.15,-0.975) 6(2.15,-0.325) 7(2.15,0.325) 8(2.15,0.975)
  silkscreen extent -2.27,-1.55 0.75,1.87, body extent -1.55,-1.55 1.55,1.55, height 1.1
R_0402 [mm] "Chip 0402 resistor"
  rrect25% 0.55x0.55 smd: 1(-0.45,0) 2(0.45,0)
  body extent -0.49,-0.24 0.49,0.24, height 0.35
R_0603 [mm] "Chip 0603 resistor"
  rrect25% 1.01x1.01 smd: 1(-0.755,0) 2(0.755,0)
  body extent -0.8,-0.4 0.8,0.4, height 0.45
SOIC-8_TCAN3404DRQ1 [mm] "Texas Instruments TCAN3404DRQ1"
  rrect50% 1.55x0.6 smd: 1(-2.7,1.905) 2(-2.7,0.635) 3(-2.7,-0.635) 4(-2.7,-1.905) 5(2.7,-1.905) 6(2.7,-0.635) 7(2.7,0.635) 8(2.7,1.905)
  silkscreen extent -2.73,-2.56 2.05,3.24, body extent -3,-2.5 3,2.5, height 1.75
SOIC-8_W25Q128JWSIM [mm] "Winbond W25Q128JWSIM 1.8V 128M-BIT  SERIAL FLASH MEMORY WITH  DUAL, QUAD SPI"
  oval 1.6x0.6 smd: 1(-3.6,1.905) 2(-3.6,0.635) 3(-3.6,-0.635) 4(-3.6,-1.905) 5(3.6,-1.905) 6(3.6,-0.635) 7(3.6,0.635) 8(3.6,1.905)
  silkscreen extent -4.27,-2.75 2.75,2.88, body extent -3.95,-2.69 3.95,2.69, height 2.16
SOT-23_ESD2CAN24DBZRQ1 [mm] "Texas Instruments ESD2CAN24DBZRQ1 CAN ESD Protection"
  rrect50% 1.3x0.6 smd: 1(-1.05,1) 2(-1.05,-1) 3(1.05,0)
  silkscreen extent -0.76,-1.58 0.76,1.58, body extent -1.32,-1.52 1.32,1.52, height 1.12
SOT-563-6_TPS56224 [mm] "SOTFL, 6-Leads, Body 1.60x1.60mm, Pitch 0.50mm, IPC Medium Density"
  oval 0.67x0.3 smd: 1(-0.74,0.5) 2(-0.74,0) 3(-0.74,-0.5) 4(0.74,-0.5) 5(0.74,0) 6(0.74,0.5)
  silkscreen extent -1.08,-0.91 0.08,1.21, body extent -0.8,-0.85 0.8,0.85, height 0.6
STM-SOT23-6L_V [mm] "SOT23, 6-Leads, Body 3.05x1.75mm, Pitch 0.95mm"
  rect 1.2x0.6 smd: 1(-1.15,0.95) 2(-1.15,0) 3(-1.15,-0.95) 4(1.15,-0.95) 5(1.15,0) 6(1.15,0.95)
  silkscreen extent -1.27,-1.55 0.15,1.92, body extent -1.6,-1.53 1.6,1.53, height 1.45
TSOP-II-86_IS42S32400J-6TL [mm] "ISSI IS42S32400J-6TL SDRAM"
  rrect50% 1.275x0.3 smd: 1(-5.713,10.5) 2(-5.713,10) 3(-5.713,9.5) 4(-5.713,9) 5(-5.713,8.5) 6(-5.713,8) 7(-5.713,7.5) 8(-5.713,7) 9(-5.713,6.5) 10(-5.713,6) 11(-5.713,5.5) 12(-5.713,5) 13(-5.713,4.5) 14(-5.713,4) 15(-5.713,3.5) 16(-5.713,3) 17(-5.713,2.5) 18(-5.713,2) 19(-5.713,1.5) 20(-5.713,1) 21(-5.713,0.5) 22(-5.713,0) 23(-5.713,-0.5) 24(-5.713,-1) 25(-5.713,-1.5) 26(-5.713,-2) 27(-5.713,-2.5) 28(-5.713,-3) 29(-5.713,-3.5) 30(-5.713,-4) 31(-5.713,-4.5) 32(-5.713,-5) 33(-5.713,-5.5) 34(-5.713,-6) 35(-5.713,-6.5) 36(-5.713,-7) 37(-5.713,-7.5) 38(-5.713,-8) 39(-5.713,-8.5) 40(-5.713,-9) 41(-5.713,-9.5) 42(-5.713,-10) 43(-5.713,-10.5) 44(5.712,-10.5) 45(5.712,-10) 46(5.712,-9.5) 47(5.712,-9) 48(5.712,-8.5) 49(5.712,-8) 50(5.712,-7.5) 51(5.712,-7) 52(5.712,-6.5) 53(5.712,-6) 54(5.712,-5.5) 55(5.712,-5) 56(5.712,-4.5) 57(5.712,-4) 58(5.712,-3.5) 59(5.712,-3) 60(5.712,-2.5) 61(5.712,-2) 62(5.712,-1.5) 63(5.712,-1) 64(5.712,-0.5) 65(5.712,0) 66(5.712,0.5) 67(5.712,1) 68(5.712,1.5) 69(5.712,2) 70(5.712,2.5) 71(5.712,3) 72(5.712,3.5) 73(5.712,4) 74(5.712,4.5) 75(5.712,5) 76(5.712,5.5) 77(5.712,6) 78(5.712,6.5) 79(5.712,7) 80(5.712,7.5) 81(5.712,8) 82(5.712,8.5) 83(5.712,9) 84(5.712,9.5) 85(5.712,10) 86(5.712,10.5)
  silkscreen extent -5.99,-11.27 5.21,12.21, body extent -5.88,-11.11 5.88,11.11, height 1.2
TSSOP-8_TLV9062IPWR [mm] "TI TLV9062IPWR Operational Amplifier"
  oval 1.5x0.45 smd: 1(-2.9,0.975) 2(-2.9,0.325) 3(-2.9,-0.325) 4(-2.9,-0.975) 5(2.9,-0.975) 6(2.9,-0.325) 7(2.9,0.325) 8(2.9,0.975)
  silkscreen extent -2.86,-1.61 2.31,2.35, body extent -3.1,-1.55 3.1,1.55, height 1.2
TSSOP-28_CS4272 [mm] "Cirrus Logic CS4272 Audio Codec"
  rrect50% 1.5x0.45 smd: 1(-2.9,4.225) 2(-2.9,3.575) 3(-2.9,2.925) 4(-2.9,2.275) 5(-2.9,1.625) 6(-2.9,0.975) 7(-2.9,0.325) 8(-2.9,-0.325) 9(-2.9,-0.975) 10(-2.9,-1.625) 11(-2.9,-2.275) 12(-2.9,-2.925) 13(-2.9,-3.575) 14(-2.9,-4.225) 15(2.9,-4.225) 16(2.9,-3.575) 17(2.9,-2.925) 18(2.9,-2.275) 19(2.9,-1.625) 20(2.9,-0.975) 21(2.9,-0.325) 22(2.9,0.325) 23(2.9,0.975) 24(2.9,1.625) 25(2.9,2.275) 26(2.9,2.925) 27(2.9,3.575) 28(2.9,4.225)
  silkscreen extent -3.49,-4.96 2.31,5.65, body extent -3.2,-4.9 3.2,4.9, height 1.2
WE-XHMI_4030 [mm] "SMD Power Inductor, body 4.30 x 4.30 mm"
  rect 3.8x1.2 smd: 1(0,1.225) 2(0,-1.225)
  Top Layer keep-out region: -2.15,0.625 2.15,0.625 2.15,-0.625 -2.15,-0.625
  silkscreen extent -2.87,-2.25 2.25,2.25, body extent -2.15,-2.15 2.15,2.15, height 3.01